# Altium PCB 48MHz1-4_TCXO.PcbDoc
Units mm, origin at the board's own origin, x right, y up, seen from the top; angles counter-clockwise.
Board outline 34.35 x 37.45 mm, 2 copper layers (Top Layer, Bottom Layer), stack 0.478 mm thick; 50 components, 24 nets, 162 pads, 215 vias.
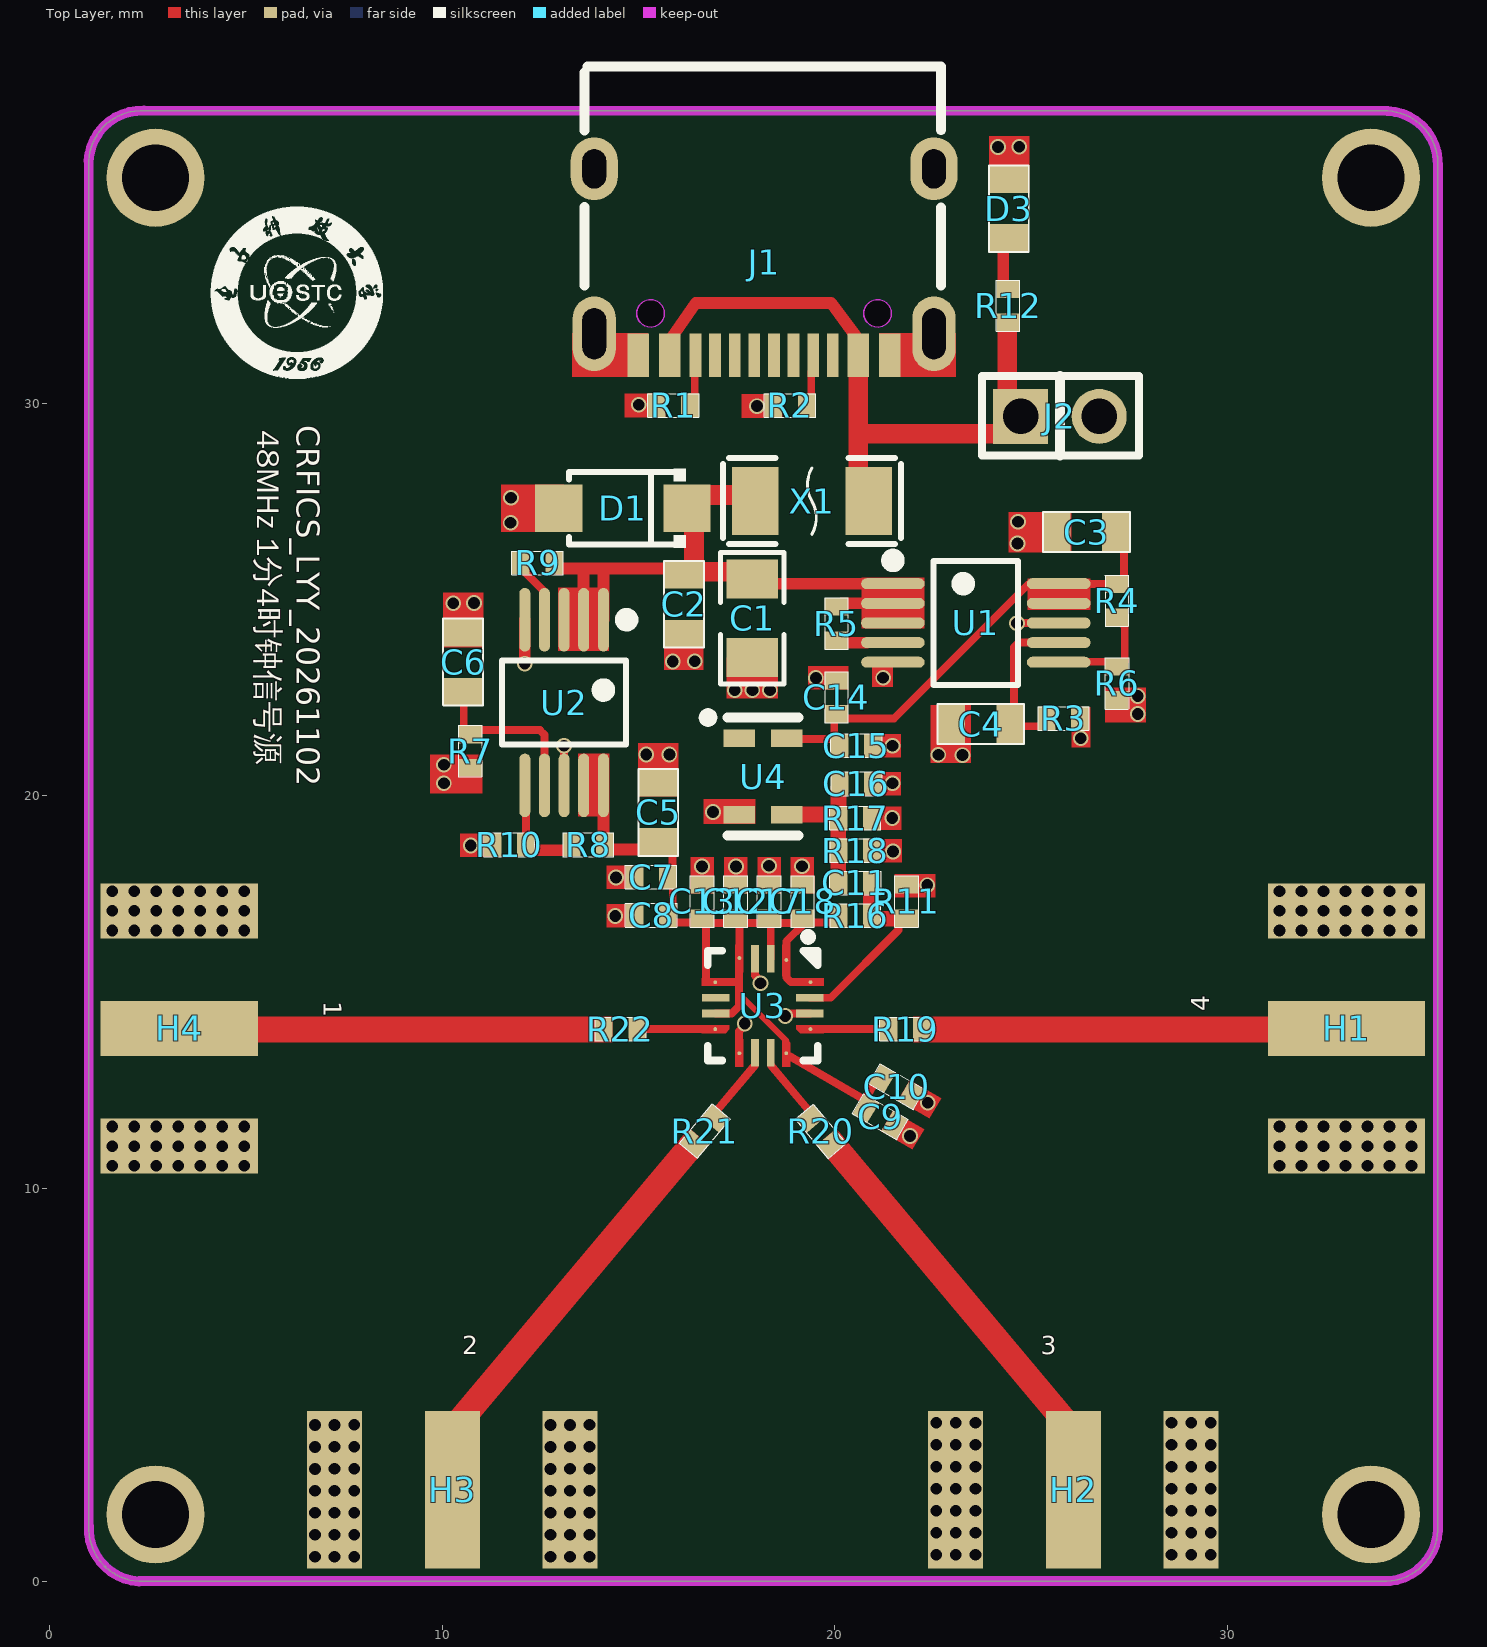
[diagram p0: Top Layer view]
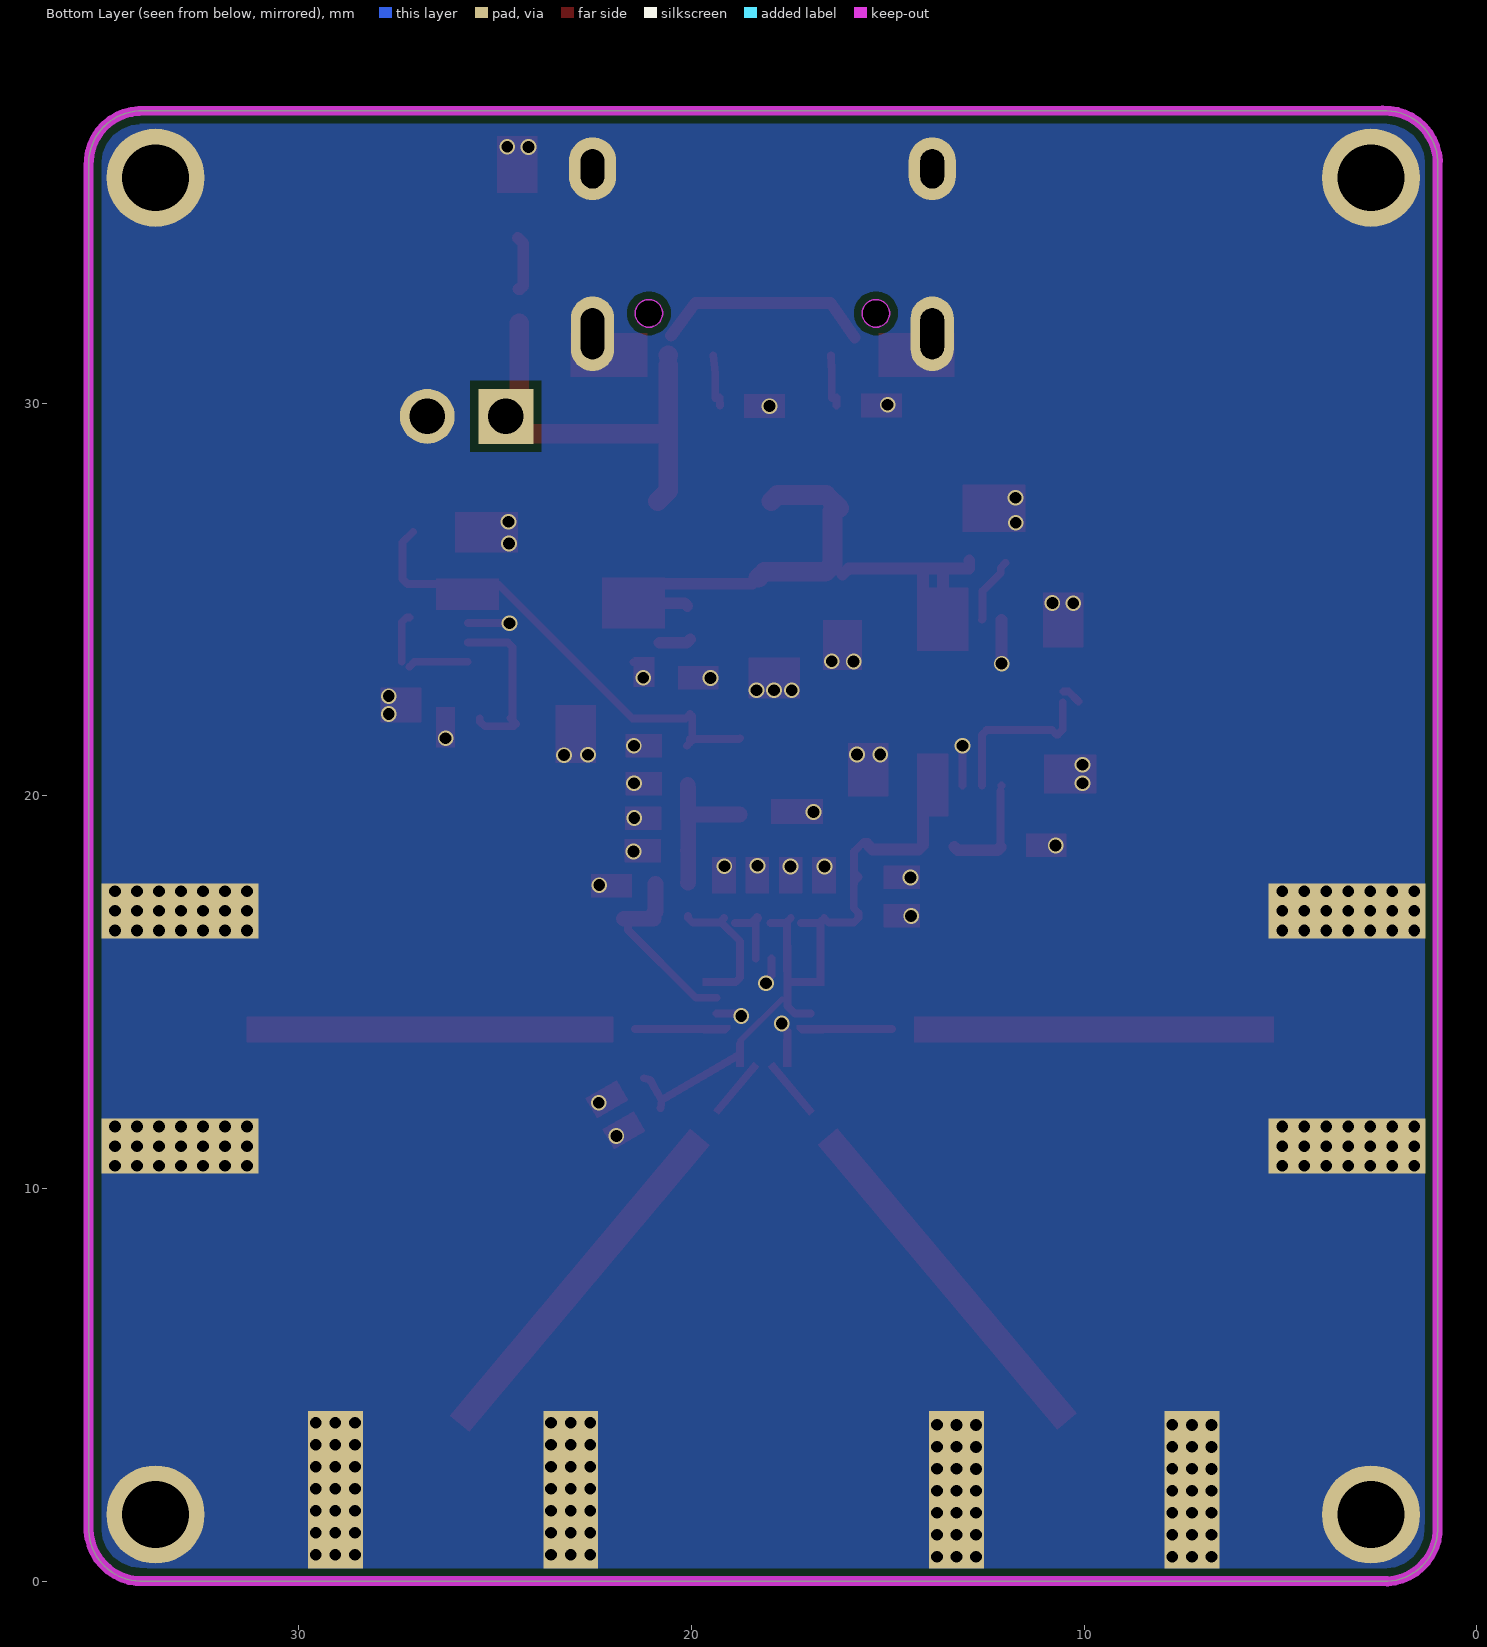
[diagram p1: Bottom Layer view, seen from below]

## Layer stack, top to bottom
Top Solder: solder mask 0.0102, Solder Resist, Dk 3.5
Top Layer: signal copper 0.0356
Dielectric 1: core 0.4064, Core-034, Dk 4.8
Bottom Layer: signal copper 0.0356
Bottom Solder: solder mask 0.0102, Solder Resist, Dk 3.5

## Board outline
2.28,-0.003 cw(c2.348,1.344) 1.001,1.411 1,36.167 0.998,36.167 cw(c2.344,36.099) 2.412,37.445 34.074,37.441 cw(c34.006,36.095) 35.352,36.027 35.352,1.28 cw(c34.005,1.348) 33.938,0.002 33.938,0

## Design rules (kind name [scope] priority, off if disabled: settings)
Clearance Clearance_1 [InNamedPolygon('NONET_L-01_P-TOP')] p1: gap=0.58 ignorepadtopadclearanceinfootprint=FALSE except(0: Arc-Text Arc-Hole Track-Text Track-Hole SMDPad-Text SMDPad-Hole THPad-Text THPad-Hole Via-Text Via-Hole Fill-Text Fill-Hole Poly-Text Poly-Hole Region-Text Region-Hole Text-Text Text-Hole; 0.4: Arc-Arc Arc-Track Arc-SMDPad Arc-THPad Arc-Via Track-Track Track-SMDPad Track-THPad Track-Via SMDPad-SMDPad SMDPad-THPad SMDPad-Via THPad-THPad THPad-Via Via-Via; 0.7: Arc-Fill Arc-Poly Arc-Region Track-Fill Track-Poly Track-Region)
Clearance Clearance_2 [InNamedPolygon('NONET_L-01_P-002')] p2: gap=0.7 ignorepadtopadclearanceinfootprint=FALSE except(0: Arc-Hole Track-Hole SMDPad-Hole THPad-Hole Via-Hole Fill-Hole Poly-Hole Region-Hole Text-Hole; 0.3: Arc-Via Track-Via SMDPad-Via THPad-Via Via-Via)
Clearance GND_Bottom [InNamedPolygon('GND_Bottom')] p3: gap=0.6 ignorepadtopadclearanceinfootprint=TRUE
Clearance Ch341_3V3 [InNamedPolygon('CH341_3V3')] p4: gap=0.5 ignorepadtopadclearanceinfootprint=TRUE
Clearance VSS [InNamedPolygon('VSS')] p5: gap=0.2 ignorepadtopadclearanceinfootprint=TRUE except(0.6: Arc-Fill Arc-Poly Arc-Region Track-Fill Track-Poly Track-Region Fill-Fill Fill-Poly Fill-Region Poly-Poly Poly-Region Region-Region)
Clearance GND [InNamedPolygon('GND_Ploy')] p6: gap=0.4 ignorepadtopadclearanceinfootprint=TRUE except(0.8: Arc-Fill Arc-Poly Arc-Region Track-Fill Track-Poly Track-Region Fill-Fill Fill-Poly Fill-Region Poly-Poly Poly-Region Region-Region)
Clearance DC_GND [InNamedPolygon('DC_Ploy')] p7: gap=0.4 ignorepadtopadclearanceinfootprint=TRUE except(0.8: Arc-Fill Arc-Poly Arc-Region Track-Fill Track-Poly Track-Region Fill-Fill Fill-Poly Fill-Region Poly-Poly Poly-Region Region-Region)
Clearance LNA [InNamedPolygon('LNA')] p8: gap=0.102 ignorepadtopadclearanceinfootprint=TRUE except(0.2: Arc-Arc Arc-Track Track-Track SMDPad-Fill SMDPad-Poly SMDPad-Region THPad-Fill THPad-Poly THPad-Region; 0.8: Arc-Fill Arc-Poly Arc-Region Track-Fill Track-Poly Track-Region Via-Fill Via-Poly Via-Region Fill-Fill Fill-Poly Fill-Region Poly-Poly Poly-Region Region-Region)
Clearance Ploy [InPolygon] p9: gap=0.2 ignorepadtopadclearanceinfootprint=TRUE
Clearance Diff [InNetClass('Diff')] p10: gap=0.152 ignorepadtopadclearanceinfootprint=TRUE
Clearance [All] p11: gap=0.1 ignorepadtopadclearanceinfootprint=TRUE except(0.102: SMDPad-SMDPad; 0.203: SMDPad-THPad)
ComponentClearance [All] p1: gap=0.1 collisioncheckmode=3 verticalgap=0.1 showdistances=FALSE donotcheckwithout3dbody=TRUE
DiffPairsRouting [All] p1: maxlimit=10 minlimit=0.1 mostfreqgap=0.178 toplayer_minwidth=0.128 toplayer_maxwidth=1.016 toplayer_prefwidth=0.422 bottomlayer_minwidth=0.128 bottomlayer_maxwidth=1.016 bottomlayer_prefwidth=0.422 maxuncoupledlength=12.7
HoleSize [All] p1: absolutevalues=TRUE maxlimit=5 minlimit=0.025 maxpercent=80.000 minpercent=20.000
HoleToHoleClearance [All] p1: gap=0 allowstackedmicrovias=TRUE
MatchedLengths MatchedLengths_1 [InNetClass('class1')] p1: tolerance=25.4 checknetsindiffpair=FALSE checkdiffpairvsdiffpair=TRUE checkxsignals=TRUE checkothers=TRUE
MatchedLengths [InNetClass('DRM')] p2: tolerance=1.27 checknetsindiffpair=FALSE checkdiffpairvsdiffpair=TRUE checkxsignals=TRUE checkothers=TRUE
MinimumSolderMaskSliver [All] p1: minsoldermaskwidth=0
PlaneConnect [All] p1: planeconnectstyle=Direct reliefexpansion=0.508 reliefentries=4 reliefconductorwidth=0.254 reliefairgap=0.254
PolygonConnect [All] p1: connectstyle=Direct reliefconductorwidth=0.254 reliefentries=4 polygonreliefangle="90 Angle" airgapwidth=0.254
RoutingVias [All] p1: holewidth=0.711 width=1.27 viastyle="Through Hole" minholewidth=0.2 minwidth=0.1 maxholewidth=2.4 maxwidth=5
SilkToSilkClearance [All] p1: silktosilkclearance=0
SilkToSolderMaskClearance [IsPad] p1: minsilkscreentomaskgap=0 clearancetoexposedcopper=TRUE
SolderMaskExpansion [IsVia] p1: expansion=0.102 istentingtop=TRUE
SupplyNets "Schematic Supply Nets_1" [InNet('GND')] p1: voltage=0.000
SupplyNets "Schematic Supply Nets" [InNet('VDD')] p2: voltage=0.000
Width [All] p1: maxlimit=5 minlimit=0.1 preferedwidth=0.1 bottomlayer_maxwidth=0.254 minimp=50.000000 maximp=50.000000 favimp=50.000000
22 further rules are at their usual default settings.

## Classes and differential pairs
net class "New Class": NetH1_1 NetH2_1 NetH3_1 NetH4_1
net class class1: CLKOUT1 CLKOUT2 CLKOUT3 CLKOUT4
component class U_POWER: C1 C2 C3 C4 C5 C6 D1 D3 J1 J2 R1 R2 R3 R4 R5 R6 R7 R8 R9 R12 U1 U2 X1
component class U_48MHz_TCXO: C7 C8 C9 C10 C11 C12 C13 C14 C15 C16 C17 C18 H1 H2 H3 H4 m R12 R16 R17 R18 R19 R20 R21 R22 U3 U4

## Components (designator, comment, footprint, x,y, rotation, side; value= is the part's Value field where it differs from the comment)
C1 "47uF" 0805C 17.895,24.52 r90 top value="20pF  NP0"
C2 "10uF" 0603_Z 16.144,24.867 r270 top value="20pF  NP0"
C3 "4.7uF" 0603_Z 26.416,26.701 r0 top value="20pF  NP0"
C4 "4.7uF" 0603_Z 23.704,21.841 r180 top value="20pF  NP0"
C5 "4.7uF" 0603_Z 15.488,19.564 r270 top value="20pF  NP0"
C6 "4.7uF" 0603_Z 10.546,23.419 r90 top value="20pF  NP0"
C7 "1uF" 0402_Z 15.311,17.937 r0 top value="20pF  NP0"
C8 "10nF" 0402_Z 15.329,16.953 r180 top value="20pF  NP0"
C9 "10nF" 0402_Z 21.16,11.823 r150 top value="20pF  NP0"
C10 "1uF" 0402_Z 21.572,12.606 r330 top value="20pF  NP0"
C11 "100nF" 0402_Z 20.508,17.788 r0 top value="20pF  NP0"
C12 "10nF" 0402_Z 17.469,17.302 r90 top value="20pF  NP0"
C13 "1uF" 0402_Z 16.617,17.302 r90 top value="20pF  NP0"
C14 "10uF" 0402_Z 20.03,22.499 r90 top value="20pF  NP0"
C15 "100nF" 0402_Z 20.554,21.271 r180 top value="20pF  NP0"
C16 "10pF" 0402_Z 20.554,20.301 r180 top value="20pF  NP0"
C17 "10nF" 0402_Z 18.332,17.32 r270 top value="20pF  NP0"
C18 "1uF" 0402_Z 19.183,17.32 r270 top value="20pF  NP0"
D1 "SMF5.0A" SMF5.0A 14.602,27.323 r180 top
D3 "LED0" 0603_Z 24.414,34.94 r270 top
H1 "SMA" SMA-SMD 33.279,13.968 r0 top
H2 "SMA" SMA-SMD 25.966,2.077 r270 top
H3 "SMA" SMA-SMD 10.366,2.582 r90 top
H4 "SMA" SMA-SMD 3.558,13.968 r0 top
J1 "typec_16pin" TYPEC_16PIN 18.07,34.481 r180 top
J2 "2pin" H2-2mm 25.731,29.663 r0 top
R1 "5.1k" 0402_Z 15.876,29.945 r0 top
R2 "5.1k" 0402_Z 18.846,29.945 r0 top
R3 "33k" 0402_Z 25.826,21.963 r180 top
R4 "91k" 0402_Z 27.184,24.977 r270 top
R5 "200k" 0402_Z 20.03,24.378 r90 top
R6 "10k" 0402_Z 27.184,22.872 r270 top
R7 "33k" 0402_Z 10.703,21.129 r90 top
R8 "91k" 0402_Z 13.731,18.748 r180 top
R9 "200k" 0402_Z 12.42,25.939 r0 top
R10 "10k" 0402_Z 11.714,18.748 r180 top
R11 "10k" 0402_Z 21.814,17.302 r90 top
R12 "10k" 0402_Z 24.414,32.49 r270 top
R16 "10k" 0402_Z 20.511,16.953 r0 top
R17 "10k" 0402_Z 20.508,19.438 r0 top
R18 "50" 0402_Z 20.508,18.612 r0 top
R19 "33" 0402_Z 21.783,14.065 r0 top
R20 "33" 0402_Z 19.634,11.464 r310 top
R21 "33" 0402_Z 16.695,11.464 r230 top
R22 "33" 0402_Z 14.549,14.054 r180 top
U1 "IBSP3030ADJMS10R00" IBSP3030ADJMS10R00 23.588,24.401 r270 top
U2 "IBSP3030ADJMS10R00" IBSP3030ADJMS10R00 13.105,22.374 r180 top
U3 "5PB1214CMGK" 5PB1214CMGK 18.166,14.657 r270 top
U4 "YSO510TP" 48MH温补晶振 18.296,20.491 r270 top
X1 "Fuse" F1206 19.414,27.504 r0 top

## Footprints (in the part's own frame and the unit in brackets; to place one, negate y for a bottom-side part, rotate by r counter-clockwise, add the part's x,y. Pads: shape width x height; smd on the part's side, far side on the other; paste and mask are expansions set on the pad)
5PB1214CMGK [mm]
  round 0.098 smd: 1(-1.162,0.598) 4(-1.212,-0.598) 5(-0.598,-1.212) 8(0.598,-1.212) 9(1.212,-0.598) 12(1.212,0.598) 13(0.598,1.212) 16(-0.598,1.212)
  rect 0.7x0.2 smd mask+0.05: 2(-1.2,0.2) 3(-1.2,-0.2) 10(1.2,-0.2) 11(1.2,0.2)
  rect 0.2x0.7 smd mask+0.05: 6(-0.2,-1.2) 7(0.2,-1.2) 14(0.2,1.2) 15(-0.2,1.2)
  Top Layer region: 0.85,-0.5 1.55,-0.5 1.55,-0.7 1.05,-0.7 0.95,-0.7 0.85,-0.6 0.85,-0.5
  Top Layer region: 0.85,0.5 0.85,0.6 0.95,0.7 1.55,0.7 1.55,0.5 0.85,0.5
  Top Layer region: -0.85,-0.5 -0.85,-0.6 -0.95,-0.7 -1.55,-0.7 -1.55,-0.5 -0.85,-0.5
  Top Layer region: -0.75,0.5 -1.55,0.5 -1.55,0.7 -1.05,0.7 -0.85,0.7 -0.75,0.6 -0.75,0.5
  Top Layer region: 0.5,1.55 0.5,0.9 0.5,0.85 0.6,0.85 0.7,0.95 0.7,1.55 0.5,1.55
  Top Layer region: -0.5,-1.55 -0.5,-0.9 -0.5,-0.85 -0.6,-0.85 -0.7,-0.95 -0.7,-1.55 -0.5,-1.55
  Top Layer region: -0.5,1.55 -0.5,0.9 -0.5,0.85 -0.6,0.85 -0.7,0.95 -0.7,1.55 -0.5,1.55
  Top Layer region: 0.5,-1.55 0.5,-0.9 0.5,-0.85 0.6,-0.85 0.7,-0.95 0.7,-1.55 0.5,-1.55
  silkscreen extent -1.85,-1.4 1.4,1.4
48MH温补晶振 [mil] "YSO510TP 48MHZ 3.3V ±1.5PPM -30~85℃ (±0.5PPM) Clipped Sine Wave"
  rect 17.3x31.5 smd: 1(-38.4,-28.6) 2(38.4,-28.6) 3(38.4,18.7) 4(-38.4,18.7)
  silkscreen extent -64,-65 59,31
0402_Z [mm]
  rect 0.45x0.6 smd mask+0: 1(0.434,-0.006) 2(-0.416,-0.006)
  silkscreen extent -0.64,-0.31 0.66,0.29, body extent -0.41,-0.31 0.44,0.29, height 0.25
0603_Z [mm]
  rect 0.7x1 smd mask+0: 1(0.735,0.013) 2(-0.765,0.013)
  silkscreen extent -1.12,-0.49 1.09,0.52
0805C [mm]
  rect 1x1.3 smd: 1(-1,0) 2(1,0)
  silkscreen extent -1.68,-0.81 1.68,0.81
F1206 [mm] "保险丝"
  rect 1.19x1.728 smd paste+0 mask+0.051: 1(-1.445,0) 2(1.445,0)
  silkscreen extent -2.27,-1.09 2.27,1.09
H2-2mm [mm]
  rect 1.4x1.4 hole 0.9: 1(-1,0)
  round 1.4 hole 0.9: 2(1,0)
  silkscreen extent -1.99,-1 2.02,1.03
IBSP3030ADJMS10R00 [mm]
  oval 0.28x1.62 smd: 1(-1,-2.11) 2(-0.5,-2.11) 3(0,-2.11) 4(0.5,-2.11) 5(1,-2.11) 6(1,2.11) 7(0.5,2.11) 8(0,2.11) 9(-0.5,2.11) 10(-1,2.11)
  silkscreen extent -1.74,-2.26 1.58,1.07
SMA-SMD [mm]
  rect 4x1.4 smd mask+0: 1(-0.253,0.108) 2(-0.253,-2.889) 2(-0.253,3.105)
  rect 4x1.4 smd far side mask+0: 4(-0.253,3.105) 5(-0.253,-2.889)
SMF5.0A [mm]
  rect 1.2x1.2 smd: 1(-1.635,0) 2(1.635,0)
  silkscreen extent -1.6,-1 1.38,1
TYPEC_16PIN [mm]
  oval 1.2x1.6 hole 0.6 slot 1 at 90 deg paste-2539.97 mask+0.05: 13(-4.452,-1.486) 14(4.198,-1.486)
  oval 1.1x1.9 hole 0.6 slot 1.3 at 90 deg paste-2539.97 mask+0.05: 13(-4.452,2.714) 14(4.198,2.714)
  rect 0.55x1.1 smd paste+0 mask+0.05: A1B12(-3.327,3.264) A4B9(-2.527,3.264) B1A12(3.073,3.264) B4A9(2.273,3.264)
  rect 0.3x1.1 smd paste+0 mask+0.05: A5(-1.377,3.264) A6(-0.377,3.264) A7(0.123,3.264) A8(1.123,3.264) B5(1.623,3.264) B6(0.623,3.264) B7(-0.877,3.264) B8(-1.877,3.264)
  Keep-Out Layer board cut-out: -2.667,2.194 -2.667,2.124 -2.72,1.996 -2.819,1.897 -2.947,1.844 -3.087,1.844 -3.215,1.897 -3.314,1.996 -3.367,2.124 -3.367,2.194 -3.367,2.264 -3.314,2.392 -3.215,2.491 -3.087,2.544 -2.947,2.544 -2.819,2.491 -2.72,2.392 -2.667,2.264 -2.667,2.194 -2.667,2.194
  Keep-Out Layer board cut-out: 3.113,2.194 3.113,2.124 3.06,1.996 2.961,1.897 2.833,1.844 2.694,1.844 2.565,1.897 2.466,1.996 2.413,2.124 2.413,2.194 2.413,2.264 2.466,2.392 2.565,2.491 2.694,2.544 2.833,2.544 2.961,2.491 3.06,2.392 3.113,2.264 3.113,2.194 3.113,2.194
  Keep-Out Layer circle w0.003: c-3.017,2.194 r0.35
  Keep-Out Layer circle w0.003: c2.763,2.194 r0.35
  Keep-Out Layer region: -2.667,2.194 -2.667,2.124 -2.72,1.996 -2.819,1.897 -2.947,1.844 -3.087,1.844 -3.215,1.897 -3.314,1.996 -3.367,2.124 -3.367,2.194 -3.367,2.264 -3.314,2.392 -3.215,2.491 -3.087,2.544 -2.947,2.544 -2.819,2.491 -2.72,2.392 -2.667,2.264 -2.667,2.194 -2.667,2.194
  Keep-Out Layer region: -2.667,2.194 -2.676,2.116 -2.702,2.042 -2.743,1.976 -2.799,1.92 -2.865,1.879 -2.939,1.853 -3.017,1.844 -3.095,1.853 -3.169,1.879 -3.235,1.92 -3.291,1.976 -3.332,2.042 -3.358,2.116 -3.367,2.194 -3.358,2.272 -3.332,2.346 -3.291,2.412 -3.235,2.468 -3.169,2.509 -3.095,2.535 -3.017,2.544 -2.939,2.535 -2.865,2.509 -2.799,2.468 -2.743,2.412 -2.702,2.346 -2.676,2.272 -2.667,2.194
  Keep-Out Layer region: 3.113,2.194 3.113,2.124 3.06,1.996 2.961,1.897 2.833,1.844 2.694,1.844 2.565,1.897 2.466,1.996 2.413,2.124 2.413,2.194 2.413,2.264 2.466,2.392 2.565,2.491 2.694,2.544 2.833,2.544 2.961,2.491 3.06,2.392 3.113,2.264 3.113,2.194 3.113,2.194
  Keep-Out Layer region: 3.113,2.194 3.104,2.116 3.078,2.042 3.037,1.976 2.981,1.92 2.915,1.879 2.841,1.853 2.763,1.844 2.685,1.853 2.611,1.879 2.545,1.92 2.489,1.976 2.448,2.042 2.422,2.116 2.413,2.194 2.422,2.272 2.448,2.346 2.489,2.412 2.545,2.468 2.611,2.509 2.685,2.535 2.763,2.544 2.841,2.535 2.915,2.509 2.981,2.468 3.037,2.412 3.078,2.346 3.104,2.272 3.113,2.194
  silkscreen extent -4.63,-4.09 4.45,1.49

## Part data
C1: library part CAP, "0805"
C2 C14: library part CAP, "0603"
C3 C4 C5 C6 C7 C8 C9 C10 C11 C12 C13 C15 C16 C17 C18: library part CAP, "0402"
D3: "Typical INFRARED GaAs LED", LatestRevisionDate=08-Jul-2005, LatestRevisionNote="Mech Layer 1 removed.", PackageDescription="LED; 2 Leads", PackageReference=LED-0, Published=8-Jun-2000, Publisher="Altium Limited"
H1 H2 H3 H4: "BWSMA-KE-P001"
R1 R2 R3 R4 R5 R6 R7 R8 R9 R10 R11 R12 R16 R17 R18 R19 R20 R21 R22: library part Res3, "Resistor", LatestRevisionDate=04-Mar-2005, LatestRevisionNote="PCB Footprint replaced.", PackageReference=J1-0603, Published=8-Jun-2000, Publisher="Altium Limited"
U3: library part 5PB1214CMGK8
U4: library part 48MHz温补晶振, "48MHz温补晶振"
X1: CURRENT=1, RESISTANCE=1m, SimulationGenericComponent=True

## Free pads (board coordinates)
  round 2.5 hole 1.7 mask+0.102: ""(2.7,1.7) ""(2.7,35.74) ""(33.65,1.7) ""(33.65,35.74)

## Via types
v1: diameter 0.4, hole 0.3, Top Layer to Bottom Layer, 168 vias
v2: diameter 0.4, hole 0.3, Top Layer to Bottom Layer, tented both sides, 47 vias

## Nets (pads, with @x,y where several pads share a name; then routed paths per layer and width w, separated by ;. In a path a pad name is that pad's centre, name@x,y a point inside that pad or via, vN(x,y) a via of type N, cw(c..) or ccw(c..) an arc to the next point about the centre after c; other vN are vias at no path point)
CLKOUT1: R19.2 U3.13 | length 2.1
  Top Layer w0.2: U3.13 R19.2@21.439,14.059
CLKOUT2: R20.2 U3.11
CLKOUT3: R21.2 U3.10
CLKOUT4: R22.2 U3.8 | length 2.1
  Top Layer w0.2: R22.2@14.893,14.06 U3.8
GND: C1.1 C2.1 C3.2 C4.1 C5.2 C6.1 C7.2 C8.1 C9.2 C10.1 C12.1 C13.1 C14.1 C15.2 C16.2 C17.2 C18.2 D1.2 D3.2 H1.2 H1.4 H1.5 H2.2 H2.4 H2.5 H3.2 H3.4 H3.5 H4.2 H4.4 H4.5 J1.13 J1.14 J1.A1B12 J1.B1A12 J2.2 pad. R1.2 R2.2 R3.2 R6.1 R7.2 R10.1 R11.1 R17.1 R18.1 U1.5 U1.8 U2.5 U2.8 U3.3 U3.9 U3.14 U4.2 | length 5.9
  Top Layer w0.2: v2(13.1,21.274) 13.105,20.934 U2.8 ; U3.9@17.559,13.454 17.559,14.003 17.704,14.148 v2(17.704,14.202) ; U3.3 17.966,15.423 18.106,15.283 v2(18.106,15.229) ; v2(18.733,14.391) 18.787,14.391 18.854,14.457 U3.14 ; v2@21.224,23.088 21.224,23.401 U1.5 ; v2(24.635,24.394) 24.639,24.398 25.695,24.398 U1.8
  Top Layer w0.3: v2@12.08,23.342 v2(12.105,23.366) U2.5
  other v1: 6.761,0.621 7.261,0.622 7.76,0.623 12.755,0.621 13.255,0.622 13.754,0.623 22.578,0.676 23.077,0.676 23.577,0.677 28.572,0.676 29.071,0.676 29.571,0.677 6.761,1.181 7.261,1.182 7.76,1.183 12.755,1.181 13.255,1.182 13.754,1.183 22.578,1.236 23.077,1.236 23.577,1.237 28.572,1.236 29.071,1.236 29.571,1.237 6.761,1.741 7.261,1.742 7.76,1.743 12.755,1.741 13.255,1.742 13.754,1.743 22.578,1.796 23.077,1.796 23.577,1.797 28.572,1.796 29.071,1.796 29.571,1.797 6.761,2.301 7.261,2.302 7.76,2.303 12.755,2.301 13.255,2.302 13.754,2.303 22.578,2.356 23.077,2.356 23.577,2.357 28.572,2.356 29.071,2.356 29.571,2.357 6.761,2.861 7.261,2.862 7.76,2.863 12.755,2.861 13.255,2.862 13.754,2.863 22.578,2.916 23.077,2.916 23.577,2.917 28.572,2.916 29.071,2.916 29.571,2.917 6.761,3.421 7.261,3.422 7.76,3.423 12.755,3.421 13.255,3.422 13.754,3.423 22.578,3.476 23.077,3.476 23.577,3.477 28.572,3.476 29.071,3.476 29.571,3.477 6.761,3.981 7.261,3.982 7.76,3.983 12.755,3.981 13.255,3.982 13.754,3.983 22.578,4.036 23.077,4.036 23.577,4.037 28.572,4.036 29.071,4.036 29.571,4.037 1.599,10.58 2.159,10.58 2.719,10.58 3.279,10.58 3.839,10.58 4.399,10.58 4.959,10.58 31.32,10.58 31.88,10.58 32.44,10.58 33,10.58 33.56,10.58 34.12,10.58 34.68,10.58 1.598,11.079 2.158,11.079 2.718,11.079 3.278,11.079 3.838,11.079 4.398,11.079 4.958,11.079 31.319,11.079 31.879,11.079 32.439,11.079 32.999,11.079 33.559,11.079 34.119,11.079 34.679,11.079 1.598,11.578 2.158,11.578 2.718,11.578 3.278,11.578 3.838,11.578 4.398,11.578 4.958,11.578 31.319,11.578 31.879,11.578 32.439,11.578 32.999,11.578 33.559,11.578 34.119,11.578 34.679,11.578 1.599,16.574 2.159,16.574 2.719,16.574 3.279,16.574 3.839,16.574 4.399,16.574 4.959,16.574 31.32,16.574 31.88,16.574 32.44,16.574 33,16.574 33.56,16.574 34.12,16.574 34.68,16.574 1.598,17.073 2.158,17.073 2.718,17.073 3.278,17.073 3.838,17.073 4.398,17.073 4.958,17.073 31.319,17.073 31.879,17.073 32.439,17.073 32.999,17.073 33.559,17.073 34.119,17.073 34.679,17.073 1.598,17.572 2.158,17.572 2.718,17.572 3.278,17.572 3.838,17.572 4.398,17.572 4.958,17.572 31.319,17.572 31.879,17.572 32.439,17.572 32.999,17.572 33.559,17.572 34.119,17.572 34.679,17.572
  other v2: 21.915,11.335 22.363,12.182 14.41,16.94 22.351,17.725 14.425,17.922 16.616,18.2 17.482,18.2 18.323,18.218 19.165,18.209 21.48,18.581 10.73,18.735 21.462,19.436 16.894,19.589 10.043,20.318 21.465,20.318 10.043,20.789 23.249,21.036 15.195,21.054 15.786,21.054 22.635,21.048 21.469,21.275 26.263,21.466 27.714,22.085 27.714,22.539 17.45,22.685 17.899,22.685 18.344,22.685 19.516,23.002 21.228,23.005 15.874,23.42 16.432,23.427 10.28,24.901 10.812,24.909 24.648,26.425 11.743,26.952 24.661,26.976 11.752,27.587 18.015,29.923 15.008,29.959 24.153,36.52 24.696,36.529
NetC3_1: C3.1 C14.2 C15.1 R4.2 U1.9 U1.10 U4.4 | length 12.3
  Top Layer w0.2: U4.4 18.793,21.444 20.035,21.444 20.036,21.36 C15.1 ; C15.1@19.983,21.412 C14.2@19.983,22.031 ; C14.2 20.155,21.964 21.501,21.964 24.922,25.386 25.683,25.386 U1.10 25.702,25.397 27.089,25.397 27.175,25.397 R4.2 27.235,25.393 27.36,25.518 27.36,26.454 C3.1@27.089,26.725
NetC4_2: C4.2 R3.1 U1.7 | length 4.3
  Top Layer w0.2: C4.2@24.56,21.969 24.56,23.784 24.677,23.901 U1.7 ; C4.2@24.615,21.973 C4.2 24.527,21.769 25.267,21.769 25.392,21.894 R3.1
NetC6_2: C6.2 R7.1 U2.7 | length 4.7
  Top Layer w0.2: C6.2@10.149,22.403 10.399,22.653 C6.2 ; C6.2@10.549,22.375 10.549,21.688 10.674,21.563 R7.1 10.817,21.671 12.487,21.671 12.605,21.554 U2.7
NetC11_1: C11.1 R11.2 R16.1 U3.15 | length 5.1
  Top Layer w0.2: U3.15 19.894,14.857 21.619,16.582 21.619,16.761 21.744,16.886 R11.2
  Top Layer w0.4: C11.1@20.917,17.758 20.919,17.755 20.919,17.048 20.97,16.998 20.97,16.871 R11.2@21.719,16.871
NetC11_2: C11.2 C16.1 R17.2 R18.2 U4.3 | length 3.9
  Top Layer w0.4: U4.3@18.777,19.521 20.067,19.521 20.092,19.496 R17.2 ; C11.2 20.088,17.787 20.088,18.602 R18.2 20.087,18.611 20.087,19.427 R17.2 ; C16.1@20.095,20.279 20.095,20.207 20.092,20.204 R17.2
NetD3_1: D3.1 R12.2 | length 1.4
  Top Layer w0.3: R12.2 24.362,32.906 24.287,32.981 24.287,34.064 D3.1
NetH1_1: H1.1 R19.1
NetH2_1: H2.1 R20.1
NetH3_1: H3.1 R21.1
NetH4_1: H4.1 R22.1
NetJ1_A4B9: J1.A4B9 J1.B4A9 J2.1 R12.1 X1.2 | length 16
  Top Layer w0.3: J1.B4A9@15.846,31.667 16.455,32.551 19.902,32.551 J1.A4B9@20.524,31.716
  Top Layer w0.5: J1.A4B9@20.592,30.963 20.592,29.22 ; J1.A4B9@20.592,31.211 J1.A4B9 ; X1.2 20.592,27.772 20.592,29.22 ; R12.1@24.385,32.031 24.385,30.113 24.775,29.723 24.775,29.714 24.281,29.22 20.592,29.22
NetJ1_A5: J1.A5 R2.1 | length 1.3
  Top Layer w0.2: R2.1 R2.1@19.289,30.139 ; R2.1@19.398,30.134 19.398,30.767 J1.A5
NetJ1_B5: J1.B5 R1.1 | length 1.3
  Top Layer w0.2: R1.1 R1.1@16.312,30.139 ; R1.1@16.432,30.134 16.432,30.767 J1.B5
NetR4_1: R4.1 R6.2 U1.6 | length 2.8
  Top Layer w0.2: U1.6@25.709,23.412 27.055,23.412 R6.2 ; R4.1 27.254,24.543 27.379,24.418 27.379,24.304 27.382,24.301 R6.2@27.382,23.416
NetR5_2: R5.2 U1.4 | length 0.8
  Top Layer w0.3: R5.2@20.036,23.985 20.122,23.899 U1.4@20.818,23.899
NetR8_1: R8.1 R10.2 U2.6 | length 2.6
  Top Layer w0.2: U2.6 U2.6@12.111,20.257 ; R10.2@12.13,18.839 U2.6@12.13,20.128
  Top Layer w0.3: R10.2@12.137,18.705 12.137,18.682 12.205,18.614 13.222,18.614 13.31,18.702 R8.1@13.31,18.705
NetR9_2: R9.2 U2.4 | length 1.7
  Top Layer w0.2: R9.2 12.129,25.808 12.129,25.675 12.589,25.215 12.589,24.499 U2.4
VBUS: C1.2 C2.2 D1.1 R5.1 R9.1 U1.1 U1.2 U1.3 U2.1 U2.2 U2.3 X1.1 | length 15.9
  Top Layer w0.3: R9.1@12.929,25.994 12.929,25.786 14.1,25.786 ; U2.2@13.598,24.499 13.598,25.61 ; U2.1 14.105,25.782 14.1,25.786 ; C2.2 16.003,25.786 14.1,25.786 ; C1.2@18.296,25.554 18.449,25.401 U1.1 ; R5.1@20.111,24.835 20.177,24.901 U1.2
  Top Layer w0.5: D1.1 16.574,27.661 17.813,27.661 X1.1 ; D1.1@16.411,27.244 16.411,25.879 16.483,25.807 16.589,25.701 18.149,25.701 C1.2@18.296,25.554
VDD: C5.1 C7.1 C8.2 C9.1 C10.2 C12.2 C13.2 C17.1 C18.1 R8.2 R16.2 U2.9 U2.10 U3.1 U3.2 U3.4 U3.5 U3.7 U3.12 U3.16 | length 22.4
  Top Layer w0.15: 17.58,14.815 17.705,14.815 18.773,13.747 U3.12@18.773,13.445
  Top Layer w0.2: C5.1 15.615,18.829 15.865,18.579 15.865,18.051 C7.1 C7.1@15.862,17.814 ; C7.1@15.862,17.75 C7.1@15.862,17.814 ; C7.1@15.862,18.017 C7.1@15.862,17.814 ; 16.72,15.287 16.72,16.789 C13.2 16.508,16.771 15.87,16.771 15.745,16.896 C8.2 15.745,17.012 15.87,17.137 15.87,17.274 15.872,17.276 15.872,17.804 C7.1@15.862,17.814 ; C13.2@16.744,16.764 C12.2@17.213,16.764 ; U3.5 17.561,15.255 ; U3.7 17.372,14.457 17.543,14.628 17.561,14.646 17.561,14.815 17.561,15.255 ; C12.2 17.584,16.776 17.595,16.764 17.993,16.764 ; U3.4@17.561,15.862 17.561,15.255 ; U3.4 C12.2@17.568,16.761 ; U3.2 C17.1@18.366,16.761 ; C17.1@18.454,16.758 C18.1@18.895,16.758 ; U3.1 18.764,16.293 C18.1@19.212,16.742 ; U3.1@18.766,15.845 18.766,15.369 18.88,15.255 U3.16 ; U3.12@18.773,13.409 C9.1@20.723,12.283 ; C18.1 19.292,16.771 19.97,16.771 20.095,16.896 R16.2 ; C9.1 20.759,12.243 21.063,12.77 C10.2
  Top Layer w0.25: C17.1 C17.1@18.422,16.79
  Top Layer w0.3: U2.10@14.105,20.116 14.105,18.748 14.222,18.632 15.392,18.632 C5.1@15.503,18.743
pads on no net: J1.A6 J1.A7 J1.A8 J1.B6 J1.B7 J1.B8 U3.6 U4.1

## Polygon pours and split planes (outlines as drawn)
GND on Bottom Layer "GND_L02_P000" (solid, pour order 0): 1.619,37.376 1.746,37.503 34.385,37.503 35.401,36.487 35.401,0.927 34.512,0.038 1.873,0.038 1.873,0.292 0.857,1.308 0.984,1.435 0.984,36.487

## Keep-outs
Keep-Out Layer:
  lines w0.254: 0.998,36.167 cw(c2.344,36.099) 2.412,37.445 34.074,37.441 cw(c34.006,36.095) 35.352,36.027 ; 1,1.397 1,36.167 ; 1.001,1.411 ccw(c2.348,1.344) 2.28,-0.003 ; 2.295,0 33.938,0 ; 33.938,0.002 ccw(c34.005,1.348) 35.352,1.28 35.352,36.027

## Other copper
Top Layer:
  region net GND: 23.088,30.668 23.088,31.781 21.123,31.781 21.123,30.668
  region net GND: 15.245,30.666 15.245,31.779 13.309,31.779 13.309,30.666
  region net GND: 13.107,26.72 13.107,27.93 11.496,27.93 11.496,26.72
  region net GND: 11.054,25.175 10.021,25.175 10.021,23.771 11.054,23.771
  region net GND: 16.014,21.344 14.981,21.344 14.981,19.976 16.014,19.976
  region net GND: 23.467,22.319 22.433,22.319 22.433,20.834 23.467,20.834
  rectangle net GND: 26.019,21.226 26.509,22.265
  region net GND: 26.025,26.193 26.025,27.226 24.415,27.226 24.415,26.193
  rectangle net GND: 23.922,35.35 24.955,36.801
  region net GND: 16.658,23.201 16.658,24.479 15.654,24.479 15.654,23.201
  region net GND: 18.549,22.483 18.549,23.516 17.245,23.516 17.245,22.483
  region net GND: 27.917,21.861 27.917,22.764 26.878,22.764 26.878,21.861
  region net GND: 20.349,22.705 20.349,23.309 19.31,23.309 19.31,22.705
  region net GND: 11.024,21.057 9.683,21.057 9.683,20.063 11.024,20.063
  region net GND: 11.49,18.44 11.49,19.044 10.451,19.044 10.451,18.44
  region net GND: 15.683,29.635 15.683,30.239 14.644,30.239 14.644,29.635
  region net GND: 18.664,29.626 18.664,30.23 17.625,30.23 17.625,29.626
  region net GND: 22.557,17.411 22.557,18.015 21.518,18.015 21.518,17.411
  region net GND: 17.974,19.283 17.974,19.913 16.656,19.913 16.656,19.283
  region net GND: 21.482,23.532 20.948,23.532 20.948,22.765 21.482,22.765
  region net NetH3_1: 10.688,3.846 16.791,11.12 16.285,11.545 10.181,4.27
  region net NetH2_1: 26.167,4.219 20.036,11.527 19.529,11.102 25.661,3.794
  region net NetH4_1: 14.334,14.381 5.175,14.381 5.175,13.72 14.334,13.72
  region net NetH1_1: 31.337,14.382 21.989,14.382 21.989,13.721 31.337,13.721
  region net CLKOUT2: 19.462,11.994 18.419,13.237 18.265,13.108 19.308,11.865
  region net CLKOUT3: 17.008,11.848 18.066,13.107 17.912,13.236 16.855,11.976
  region net VDD: 14.261,21.078 13.459,21.078 13.459,19.468 14.261,19.468
  region net NetC3_1: 26.512,24.731 26.512,25.532 24.902,25.532 24.902,24.731
  region net VBUS: 22.282,24.256 22.282,25.562 20.672,25.562 20.672,24.256
  rectangle net VBUS: 12.947,23.691 14.254,25.301
  region net GND: 16.329,17.517 16.921,17.517 16.921,18.434 16.329,18.434
  region net GND: 17.178,17.514 17.77,17.514 17.77,18.431 17.178,18.431
  region net GND: 18.034,17.521 18.626,17.521 18.626,18.437 18.034,18.437
  region net GND: 18.876,17.517 19.468,17.517 19.468,18.434 18.876,18.434
  region net GND: 21.678,20.976 21.678,21.568 20.761,21.568 20.761,20.976
  region net GND: 21.681,20.009 21.681,20.601 20.764,20.601 20.764,20.009
  region net GND: 21.686,19.133 21.686,19.724 20.769,19.724 20.769,19.133
  region net GND: 21.703,18.305 21.703,18.896 20.787,18.896 20.787,18.305
  region net GND: 15.11,17.63 15.11,18.222 14.193,18.222 14.193,17.63
  region net GND: 15.105,16.649 15.105,17.241 14.188,17.241 14.188,16.649
  region net GND: 21.477,11.966 21.181,11.454 21.975,10.995 22.271,11.508
  region net GND: 21.909,12.759 21.613,12.246 22.407,11.788 22.703,12.3

## Silkscreen, mask and mechanical layers (free items; w line width, h text height)
Top Overlay:
  drawing of 37 lines, arcs and shapes, not listed
  text "CRFICS_LYY_20261102" at 6.111,29.438 h1 r270
  text "48MHz 1分4时钟信号源" at 5.095,29.311 h1 r270
  text "1" at 6.826,14.77 h0.8 r270
  text "4" at 29.686,14.516 h0.8 r90
  text "2" at 10.509,5.626 h0.8
  text "3" at 25.241,5.626 h0.8

## Dimensions
0,0 to 35.352,1.28 on Top Overlay
-0.016,0 to 2.412,37.445 on Top Overlay